# Altium PCB PCB_STM32-v1.1.PcbDoc (part 2 of 3)
Units mil, origin at the board's own origin, x right, y up, seen from the top; angles counter-clockwise.
Board outline 4000 x 2000 mil, 2 copper layers (Top Layer, Bottom Layer), stack 61.811 mil thick; 77 components, 88 nets, 371 pads, 188 vias.
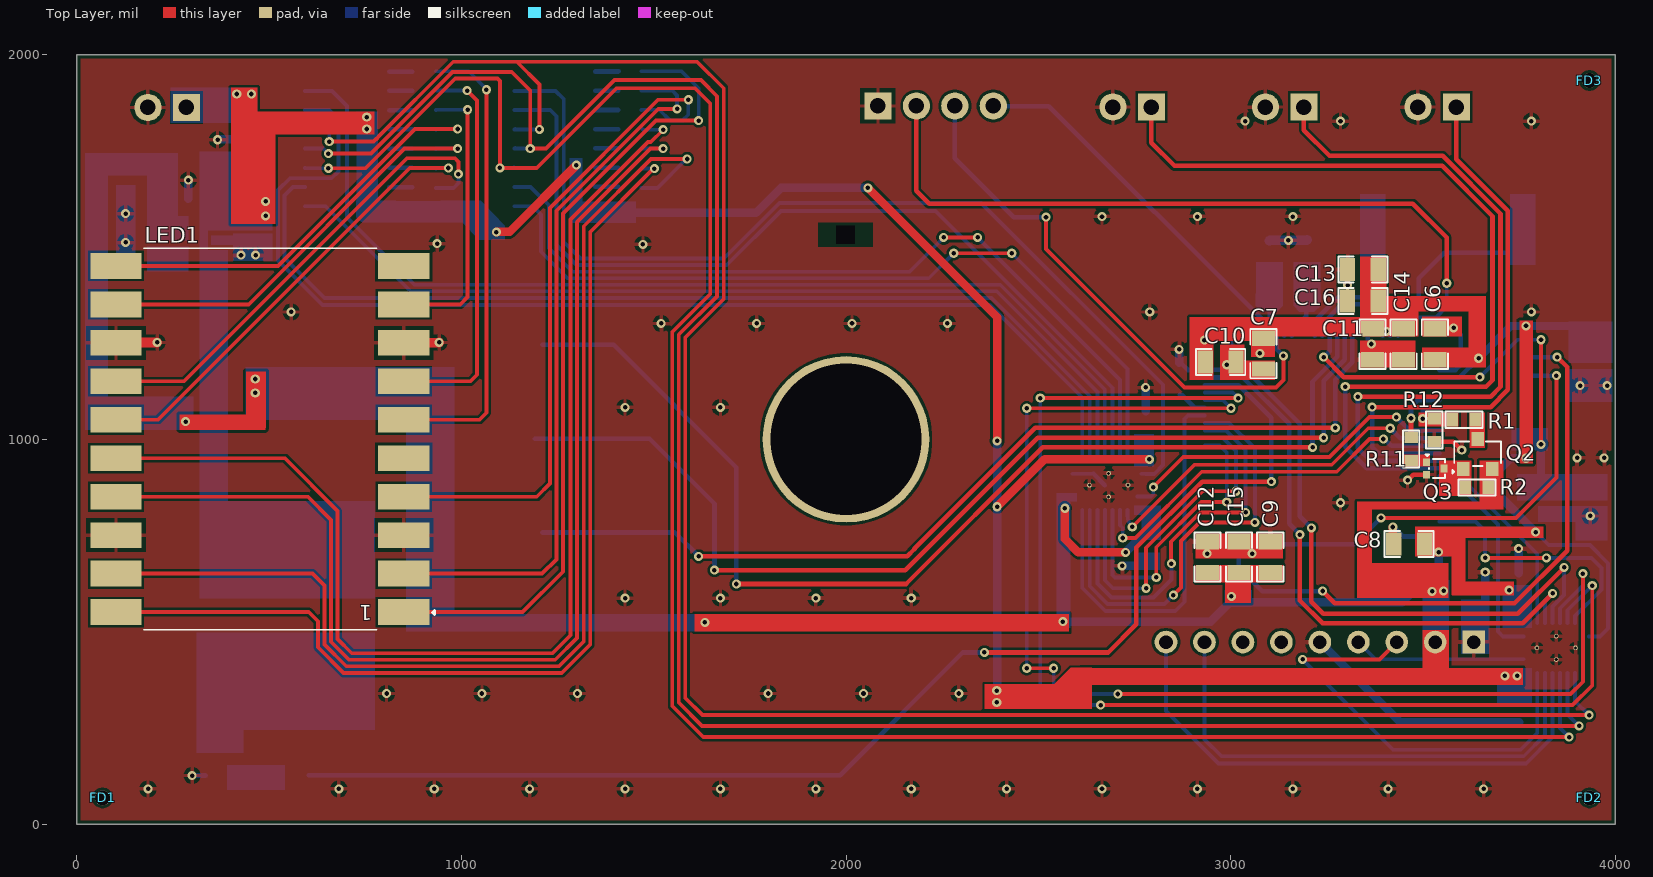
[diagram p0: Top Layer view]

## Part data (continued)
U4 U6: "IC 8-BIT TRNSLTR 15KV ESD 20VQFN", Manufacturer="Texas Instruments", Supplier Part Number=296-21528-1-ND, Category="Voltage Level Shifters", ComponentLink1Description=https://datasheet.ciiva.com/15096/getdatasheetpartid-172984-15096214.pdf?src-supplier=Verical, ComponentLink1URL=https://datasheet.ciiva.com/15096/getdatasheetpartid-172984-15096214.pdf?src-supplier=Verical, ComponentLink2Description=https://datasheet.ciiva.com/1899/txb0108-1899601.pdf?src-supplier=Digikey, ComponentLink2URL=https://datasheet.ciiva.com/1899/txb0108-1899601.pdf?src-supplier=Digikey, ComponentLink3Description=https://datasheet.ciiva.com/1899/txb0108-1899602.pdf?src-supplier=Digikey, ComponentLink3URL=https://datasheet.ciiva.com/1899/txb0108-1899602.pdf?src-supplier=Digikey, ComponentLink4Description=https://datasheet.ciiva.com/1899/txb0108-1899603.pdf?src-supplier=Digikey, ComponentLink4URL=https://datasheet.ciiva.com/1899/txb0108-1899603.pdf?src-supplier=Digikey, ComponentLink5Description=https://datasheet.ciiva.com/1508/1811182-1508728.pdf?src-supplier=Element14, ComponentLink5URL=https://datasheet.ciiva.com/1508/1811182-1508728.pdf?src-supplier=Element14, Manufacturer Part Number=TXB0108RGYR, Pricing="1=1.55, 10=1.394, 25=1.3156, 100=1.1208, 250=1.0524, 500=0.92086, 1000=0.763 (USD)", RoHS=Yes, Stock=3013, Supplier=Digikey
X1: library part J49SMH-B-G-G-K-8M0, "Crystal 8.0MHZ 16PF SMD", Manufacturer=Jauch, Package=Custom, Supplier Part Number=1908-J49SMH-B-G-G-K-8M0CT-ND, Category=Uncategorized, Item Type=Crystal, Manufacturer Part Number=J49SMH-B-G-G-K-8M0, Pricing="1=0.22, 10=0.184, 50=0.1658, 100=0.1475, 500=0.14008 (USD)", RoHS=No, Stock=4777, Supplier=Digikey
X2: library part MU00525-32.768K, "CRYSTAL 32.7680KHZ 6PF SMD", LCSC Part Number=-, Manufacturer=NDK, Package=Custom, Supplier Part Number=644-MU00525-32.768KCT-ND, ComponentLink1Description=Digikey, ComponentLink1URL=https://www.digikey.com/en/products/detail/ndk-america-inc/MU00525-32-768K/9172042?s=N4IgTCBcDaIHIA0DMYCMBWAygQQLQoDoB2ANgA4BpACQC1cBRBTABmbwFkBVV9MdEALoBfIA, Item Type=Crystal, Manufacturer Part Number=MU00525-32.768K, Pricing="1=0.72, 10=0.601, 50=0.5408, 100=0.4808, 500=0.45672, 1000=0.38461 (USD)", RoHS=No, Stock=133793, Supplier=Digikey

## Free pads (board coordinates)
  round 433.07 hole 393.7 unplated: MH(2000,1000)

## Via types
v1: diameter 23.62, hole 11.81, Top Layer to Bottom Layer, 188 vias

## Nets (pads, with @x,y where several pads share a name; then routed paths per layer and width w, separated by ;. In a path a pad name is that pad's centre, name@x,y a point inside that pad or via, vN(x,y) a via of type N, cw(c..) or ccw(c..) an arc to the next point about the centre after c; other vN are vias at no path point)
3V3: C3.2 C4.2 C6.2 C7.2 C8.2 C9.2 C10.2 C11.2 C12.2 C13.2 C14.2 C15.2 C16.2 C24.2 C26.2 J3.1 R8.1 U1.5 U2.6 U2.21 U2.22 U2.28 U2.50 U2.73 U2.75 U2.100 U4.2 U4.10 U6.2 U6.10 | length 3127.3
  Top Layer w12: C8.2@3504,728 3520,728 v1(3541,707)
  Top Layer w22: v1(1633,524) v1@1635,526 ; v1(2569,821) 2569,741 2604,706 v1(2727,706) ; C6.2@3531.5,1208 v1@3635,1208
  Bottom Layer w10: U2.21@3395.48,1269.12 3395.48,1280.09 3396.39,1281 v1(3405,1281) ; v1(3793,759) 3827,725 3934,725 3981,678 3981,508 3960.5,487.5 U4.10@3931.27,487.5 ; 3884,1295 3931,1248 3931,1215.77 J3.1@3931.77,1215
  Bottom Layer w12: v1(2932,1258) 2932,1200.32 2932.09,1200.22 U2.100@2932.88,1200.22 ; v1@3001.87,592.07 U2.75@3001.87,641.26 ; 3041.07,584.07 U2.73@3041.07,650.81 ; U2.73@3041.07,658.81 U2.73@3041.15,658.88 ; v1(3076,1223.81) 3078.88,1223.81 3100.11,1245.04 3100.11,1269.02 U2.6@3100.2,1269.12 ; U2.21@3395.48,1269.12 U2.21@3395.57,1269.21 ; v1(3405,1281) 3415.07,1281 3415.17,1280.91 U2.22@3415.17,1269.12 U2.22@3415.26,1269.21 ; v1(3541,707) 3541,727.68 3541.09,727.78 U2.50@3543.12,727.78 ; U2.28@3543.12,1160.85 3594.85,1160.85 v1(3645,1211) ; C26.2@3726,586 3740,572 C26.2@3749,572
  Bottom Layer w20: v1(3645,1211) 3729,1295 3766,1295 3884,1295
  Bottom Layer w22: v1(2564,526) 2948,526 2995,573 2995,574 3001,580 3002,580 v1(3002,592) 3018,576 ; v1(2727,706) 2727.31,706.31 2727.31,707.31 C24.2@2786,766 ; 3041.07,576 3446,576 3541,671 v1(3541,707) ; v1@3771,951 3770.69,950.69 3727.69,950.69 3690.83,913.83 3690.83,871.83 R8.1@3688,869 3688,864 v1(3793,759)
  other v1: 3724,608 3768,951 283,1046 464,1121 464,1157 3768,1295
5V: C1.1 C2.2 C22.2 C23.1 C25.2 C27.2 C28.2 C29.2 D1.1 J1.1 J8.2 LS1.1 Q2.2 R2.1 U1.1 U1.3 U3.16 U4.19 U5.16 U6.19 | length 3049.9
  Top Layer w22: v1(1091,1539) 1091.31,1539.31 1125.31,1539.31 v1@1298.69,1712.69 ; v1(2057,1654) 2393,1318 2393,996.75 v1@2392.69,996.75 ; v1(2393,824.96) 2516.23,948.19 v1(2789,948.19)
  Bottom Layer w12: 2765.58,942 v1@2789,942 ; v1@3529,600 3529.5,600.5 3558.5,600.5 3559,601 3559,561 C23.1@3547,549
  Bottom Layer w22: U3.16@1346.23,1606 C25.2@1417,1606 ; C25.2@1417,1589 1766,1589 1831,1654 v1(2057,1654) ; v1(2392,316) v1(2392,347) ; v1@2393,348 v1(2393,824.96) ; v1@2393,825.91 v1(2393,996)
  other v1: 3713,385 3745,385 3524,605 3554,606 491,1581 491,1619 1299,1713 754,1807 754,1838 416,1898 454,1898
BAT_ADC: R1.1 R12.2 U2.32 | length 97.3
  Top Layer w12: v1(3499.65,1054) R12.2@3529.5,1054
  Bottom Layer w12: v1(3499.65,1054) 3499.65,1075.08 3506.68,1082.11 U2.32@3543.12,1082.11
BAT_STAT: R11.1 U2.31 | length 160
  Top Layer w12: R11.1@3469.04,1005.46 v1(3469.04,1055.04)
  Bottom Layer w12: v1(3469.04,1055.04) 3469.04,1084.04 3486.8,1101.8 U2.31@3543.12,1101.8
BI: U2.96 U4.7 | length 3231
  Top Layer w10: v1(2505,1107.5) v1(3019.5,1107.5) ; v1(2662,309) 3889.17,309 3940.19,360.02 v1(3940.19,619.84)
  Bottom Layer w10: v1@2505,1107 2505,332 2528,309 v1(2662,309) ; U2.96@2932.88,1121.48 3005.52,1121.48 v1(3019.5,1107.5) ; U4.7@3876.15,522.93 3876.15,555.8 v1(3940.19,619.84)
BLACK_BUTTON: J4.3 U2.7 | length 1416
  Top Layer w10: v1(2520,1578) 2520,1495 2880.19,1134.81 3117.81,1134.81 3137.34,1154.34 v1(3137.34,1217)
  Bottom Layer w12: J4.3@2283,1867 2283,1731 2436,1578 v1(2520,1578) ; U2.7@3119.89,1269.12 3119.89,1234.45 v1(3137.34,1217)
BOOT: R7.2 U2.94 | length 78.9
  Bottom Layer w12: R7.2@2868,1116 2873,1116 2906.89,1082.11 U2.94@2932.88,1082.11
BUTTON_1: J5.1 U2.38 | length 1447.7
  Top Layer w12: v1(3368,1084) 3676,1084 3720.81,1128.81 3720.81,1594.19 3587,1728 J5.1@3587,1864
  Bottom Layer w12: v1(3368,1084) 3368,980 3384,964 U2.38@3543.12,964
BUTTON_2: J6.1 U2.39 | length 1852.4
  Top Layer w12: J6.1@3190.5,1864 3190.5,1803.5 3257,1737 3551.13,1737 3701.81,1586.32 3701.81,1136.81 3676,1111 v1(3331,1111)
  Bottom Layer w12: v1(3331,1111) 3331,977.05 3363.74,944.32 U2.39@3543.12,944.32
BUTTON_3: J7.1 U2.40 | length 2299.6
  Top Layer w12: J7.1@2794,1864 2794,1771 2854,1711 3550.26,1711 3680.81,1580.45 3680.81,1153.81 3664,1137 v1(3298,1137)
  Bottom Layer w12: v1(3298,1137) 3298,981 3354.37,924.63 U2.40@3543.12,924.63
BUZZER: R18.1 U2.97 | length 3310.6
  Top Layer w12: v1(2360,446) 2682,446 2755,519 2755,719 2926,890 v1(3106,890)
  Bottom Layer w12: R18.1@603,127 1985,127 2304,446 v1(2360,446) ; U2.97@2932.88,1141.17 3020.92,1141.17 3106,1056.09 v1(3106,890)
GND: C1.2 C2.1 C3.1 C4.1 C5.1 C6.1 C7.1 C8.1 C9.1 C10.1 C11.1 C12.1 C13.1 C14.1 C15.1 C16.1 C17.1 C18.1 C19.1 C20.1 C21.1 C22.1 C23.2 C24.1 C25.1 C26.1 C27.1 C28.1 C29.1 J1.2 J3.3 J3.5 J3.9 J4.1 J5.2 J6.2 J7.2 J8.1 J8.5 LED1.3 LED1.8 LED1.13 LED1.18 Q1.2 Q3.2 R7.1 R12.1 SW1.2 U1.2 U2.19 U2.20 U2.27 U2.49 U2.74 U2.99 U3.8 U4.11 U4.21 U5.8 U6.11 U6.21 | length 2243.5
  Top Layer w12: C8.1@3422,730 C8.1@3424,728 ; v1(3460,894) 3474.5,908.5 Q3.2@3509.5,908.5 ; R12.1@3529.5,994 3579,994 v1(3601,972)
  Top Layer w22: C8.1@3422,730 v1(3422,772.19)
  Top Layer w25: LED1.13@102.98,1252 v1(209,1252) ; LED1.8@850.02,1251 941,1251 v1(942,1252)
  Top Layer w50: LED1.13@101.98,1251 LED1.13@102.98,1252
  Bottom Layer w10: U6.11@2588.35,910.53 U6.11@2598.35,910.53 U6.21@2643.47,910.53
  Bottom Layer w12: 120,1502 130,1512 140,1512 ; v1(300,126) 335.23,126 Q1.2@335.6,125.63 ; U6.21@2643.47,910.53 U6.21@2673,881 ; R7.1@2868,1196 2873,1196 2888.46,1180.54 U2.99@2932.88,1180.54 2932.98,1180.63 2977.16,1180.63 2990,1193.47 v1(2990,1194) ; U2.74@3021.46,658.88 3021.46,696.05 3028.49,703.08 3055.89,703.08 v1(3056,702.97) v1@3061,702.97 ; U2.19@3356.11,1269.12 3356.11,1251.59 3357.48,1250.22 3364.78,1250.22 3367,1248 3369.22,1250.22 3374.43,1250.22 U2.20@3375.7,1251.5 ; v1(3422,772.19) 3424.81,772.19 3449.54,747.46 U2.49@3543.12,747.46 ; U2.27@3543.12,1180.54 3584.74,1180.54 3598,1193.8 3598,1272 v1(3580,1290)
  Bottom Layer w22: C1.2@290,1626 v1(290,1674) ; v1(366,1779) 366.44,1779 367.44,1780 C22.1@435,1780 ; v1@2718.75,671 2761,671 2776,686 C24.1@2786,686 ; C29.1@2779,1073 v1(2779,1135) ; R7.1@2866.31,1198.64 v1@2866.31,1233.69 ; J8.5@3232,473 3440,265 C27.1@3751,265 ; 3662,555 v1(3662,655) ; C26.1@3749,652 v1(3749,716)
  Bottom Layer w25: C19.1@3101,1516 3102.5,1517.5 v1(3150,1517.5) 3197.5,1517.5 C20.1@3199,1519
  other v1: 185.32,91.22 681.38,91.22 929.41,91.22 1177.44,91.22 1425.47,91.22 1673.5,91.22 1921.54,91.22 2169.57,91.22 2417.6,91.22 2665.63,91.22 2913.66,91.22 3161.69,91.22 3409.72,91.22 3657.76,91.22 805.39,339.25 1053.43,339.25 1301.46,339.25 1797.52,339.25 2045.55,339.25 2293.58,339.25 1425.47,587.28 1673.5,587.28 1921.54,587.28 2169.57,587.28 2718,671 2939,702.97 3935,801 3285.71,835.32 3901,952 3971.19,952 1425.47,1083.35 1673.5,1083.35 3908.81,1140 3979,1140 2866,1234 3366,1248 1519.49,1301.38 1767.52,1301.38 2015.55,1301.38 2263.58,1301.38 557.36,1331.38 2789.65,1331.38 3781.77,1331.38 3304,1401 427,1479 465,1479 1472,1507 937,1509 127,1512 2665.63,1579.41 2913.66,1579.41 3161.69,1579.41 127,1587 3037.68,1827.44 3285.71,1827.44 3781.77,1827.44
GREEN_BUTTON: J4.2 U2.23 | length 2012
  Top Layer w12: J4.2@2183,1867 2183,1646 2216,1613 3473.97,1613 3562,1524.97 v1(3562,1406)
  Bottom Layer w10: U2.23@3434.85,1269.12 3434.85,1308.85 3443,1317 3534,1317 3562,1345 v1(3562,1406)
HS_A1: U3.7 U6.20 | length 2614.8
  Bottom Layer w10: U3.7@1138.35,1906 1245,1906 1266.28,1884.72 1266.28,1512.99 1309.27,1470 1682,1470 1827,1615 2351,1615 2824,1142 2824,933 2801.38,910.38 2779.14,910.38 2778.99,910.53 U6.20@2767.65,910.53
HS_A2: U5.7 U6.15 | length 2748.1
  Bottom Layer w10: U5.7@593.35,1906 664,1906 703,1867 703,1577 878,1402 2400.96,1402 2672.88,1130.08 U6.15@2672.88,952.77
HS_B1: U3.1 U6.18 | length 2117.1
  Top Layer w10: v1@2279.75,1484 v1(2280.26,1484) v1(2431,1484)
  Bottom Layer w10: U3.1@1138.35,1606 1185.96,1606 1207,1584.96 1207,1488 1276,1419 2215.26,1419 2278.26,1482 v1@2281,1482 ; v1(2431,1484) 2732.21,1182.79 U6.18@2732.21,945.96